# Altium PCB NB2DSK01.PcbDoc (part 2 of 17)
Units mil, origin at the board's own origin, x right, y up, seen from the top; angles counter-clockwise.
Board outline 11815 x 6500.03 mil, 8 copper layers (Top Layer, MidLayer1, MidLayer2, GND, PWR, MidLayer3, MidLayer4, Bottom Layer), stack 74.62 mil thick; 798 components, 1002 nets, 3927 pads, 3182 vias.
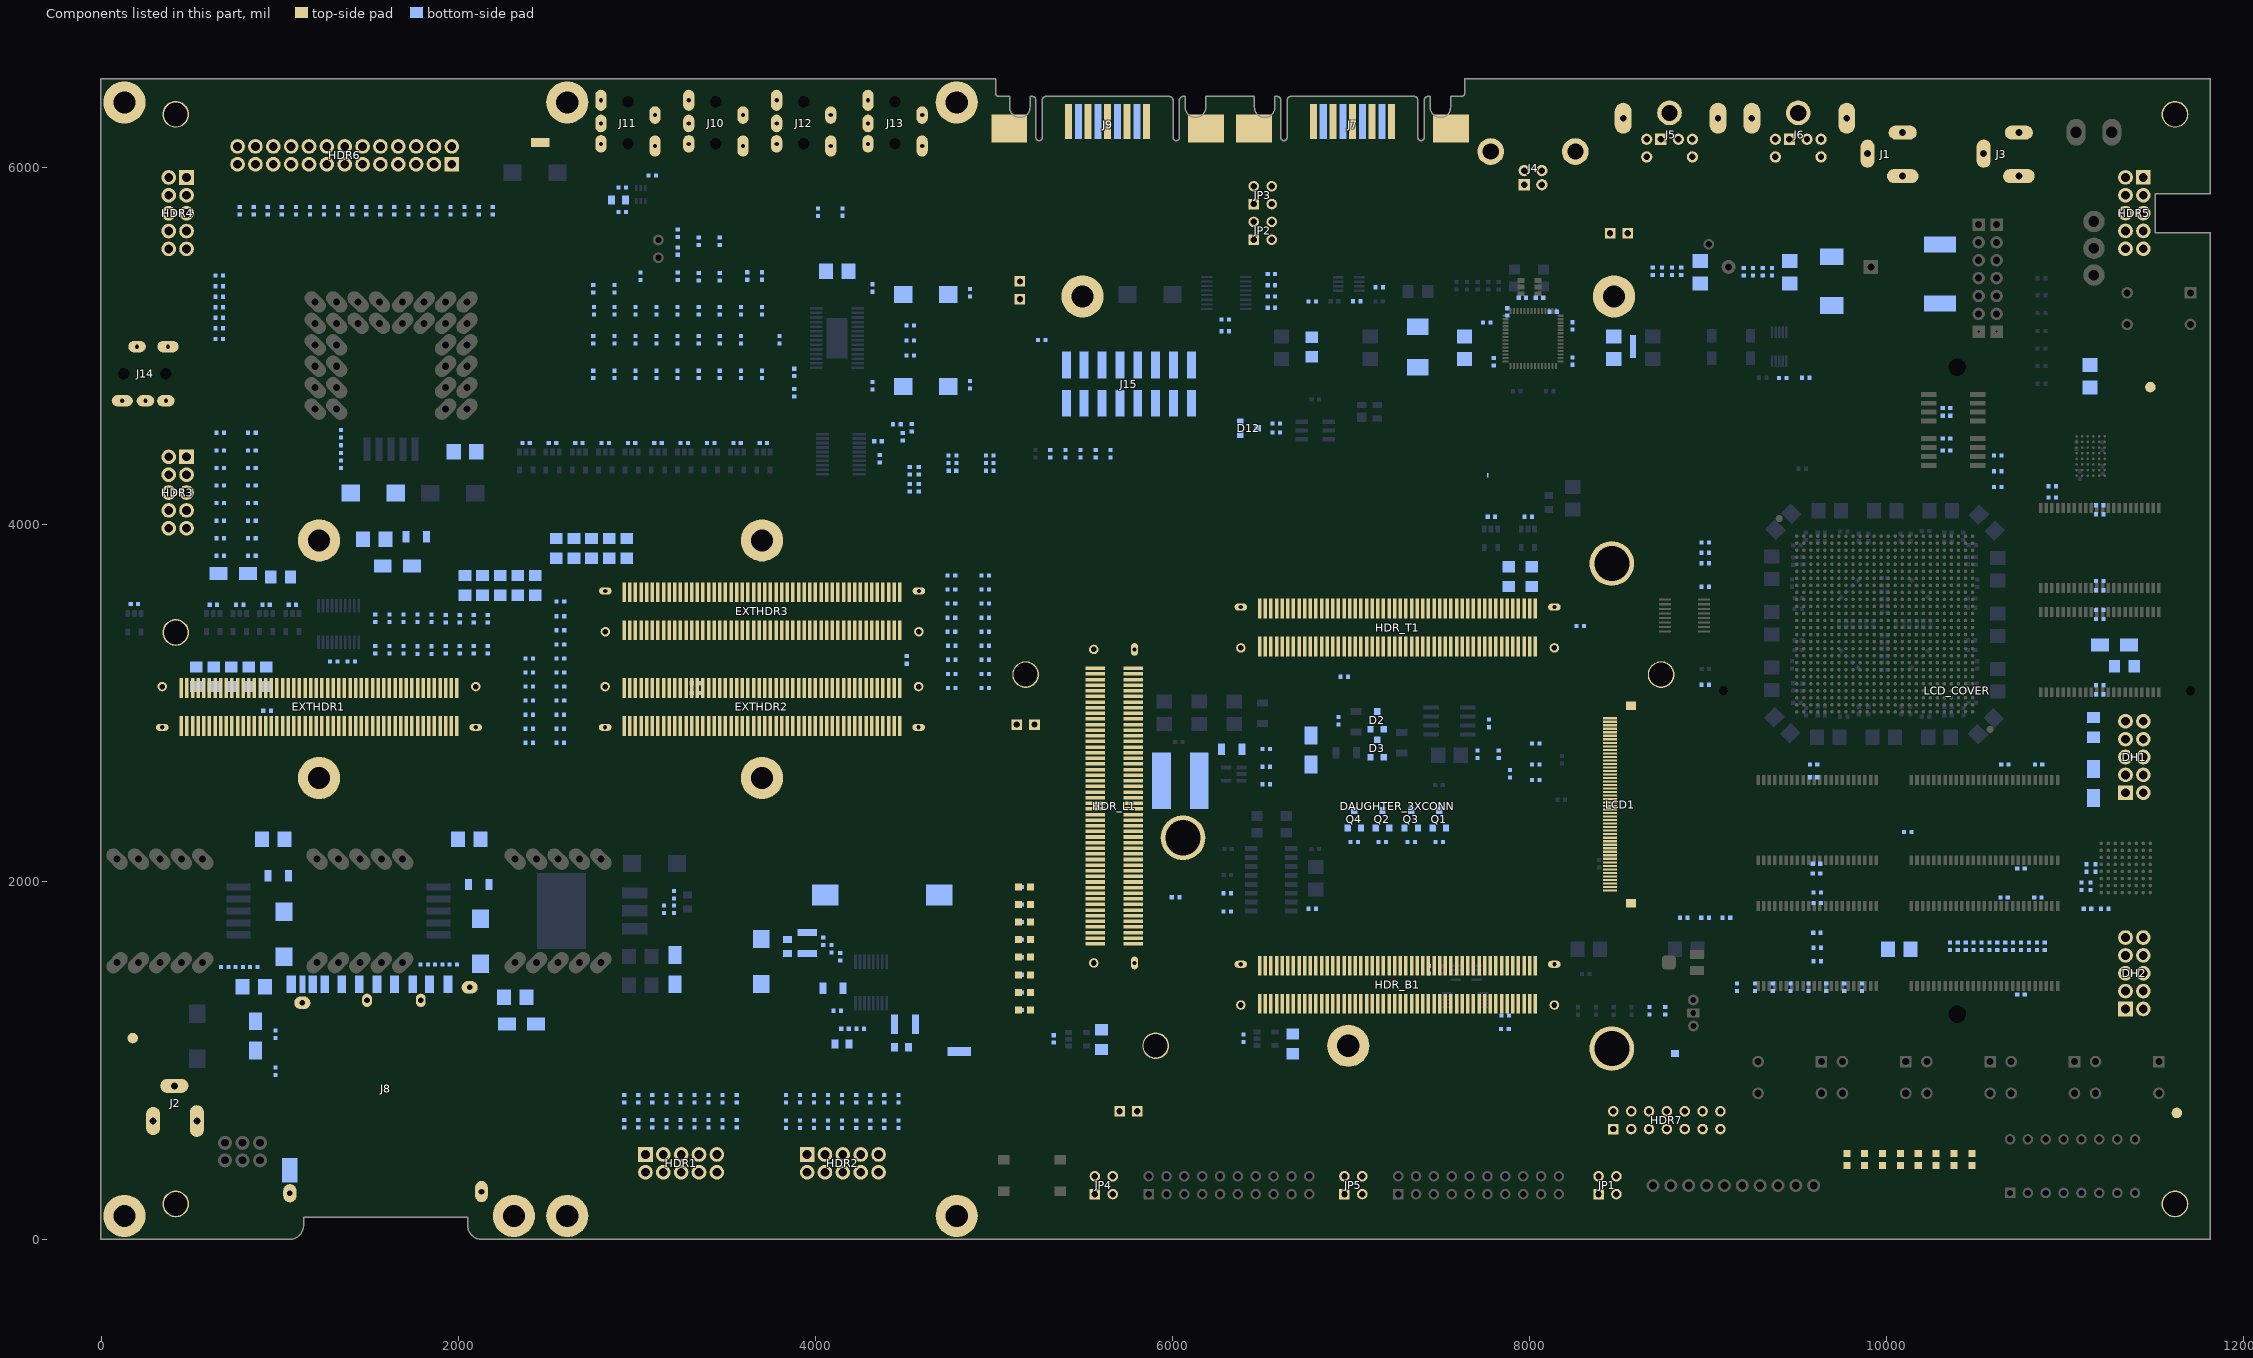
[diagram p8: the components of this part, seen from the top]

## Components (designator, comment, footprint, x,y, rotation, side; value= is the part's Value field where it differs from the comment) (continued)
C144 "1uF 25V" CAPC3216-STAR 6330.71,2744.1 r0 bottom locked (schematic designator C6)
C145 "470pF 50V" CAPC1005-STAR 4165.68,1178.45 r180 bottom (schematic designator C1)
C146 "10uF 10V" CAPC2012-STAR 4482.68,1074.45 r180 bottom (schematic designator C2)
C147 "22uF 10V" CAPC3225-STAR 4500.68,1203.45 r180 bottom (schematic designator C3)
C148 "10uF 10V" CAPC2012-STAR 3843.68,1638.45 r90 bottom (schematic designator C4)
C149 "22uF 10V" CAPC3225-STAR 3953.68,1658.45 r90 bottom (schematic designator C5)
C150 "220uF 10V" CAPC7343-STAR 3696.85,1555.12 r270 bottom (schematic designator C6)
C151 "1uF 25V" CAPC3216-STAR 4098.68,1405.45 r180 bottom (schematic designator C7)
C152 "10uF 10V" CAPC2012-STAR 4149.68,1093.45 r0 bottom (schematic designator C8)
C153 "0.1uF 16V" CAPC1005-STAR 6553.81,5405.51 r0 bottom (schematic designator C1)
C154 "0.1uF 16V" CAPC1005-STAR 6553.81,5342.52 r180 bottom (schematic designator C3)
C155 "0.1uF 16V" CAPC1005-STAR 6553.81,5279.53 r0 bottom (schematic designator C2)
C156 "0.1uF 16V" CAPC1005-STAR 6553.81,5216.54 r0 bottom (schematic designator C4)
C157 "1uF 25V" CAPC3216-STAR 2114.17,1986.59 r0 bottom (schematic designator C2)
C158 "10uF 20V" CAPC3528-STAR 2061.02,2238.45 r180 bottom (schematic designator C1)
C159 "10uF 20V" CAPC3528-STAR 2318.68,1353.45 r0 bottom (schematic designator C3)
C160 "220uF 10V" CAPC7343-STAR 2123.68,1668.45 r90 bottom (schematic designator C4)
C161 "1uF 25V" CAPC3216-STAR 992.13,2034.68 r0 bottom (schematic designator C2)
C162 "10uF 20V" CAPC3528-STAR 963.68,2238.45 r180 bottom (schematic designator C1)
C163 "10uF 20V" CAPC3528-STAR 853.68,1413.45 r180 bottom (schematic designator C3)
C164 "220uF 10V" CAPC7343-STAR 1023.68,1707.45 r90 bottom (schematic designator C4)
C165 "1uF 25V" CAPC3216-STAR 1763.68,3933.45 r180 bottom (schematic designator C2)
C166 "10uF 20V" CAPC3528-STAR 2037.4,4409.45 r0 bottom (schematic designator C1)
C167 "10uF 20V" CAPC3528-STAR 1528.68,3918.45 r0 bottom (schematic designator C3)
C168 "220uF 10V" CAPC7343-STAR 1523.68,4178.45 r0 bottom (schematic designator C4)
C169 "10uF 20V" CAPC3528-STAR 8955.24,5414.21 r270 bottom (schematic designator C1)
C170 "10uF 20V" CAPC3528-STAR 9456.18,5414.21 r270 bottom (schematic designator C1)
C171 "1uF 6.3v" CAPC1005-STAR 2874.02,4842.52 r270 bottom locked (schematic designator C6)
C172 "4.7nF 25V" CAPC1005-STAR 2755.91,4842.52 r270 bottom locked (schematic designator C7)
C173 "1uF 6.3v" CAPC1005-STAR 2992.13,4842.52 r270 bottom locked (schematic designator C8)
C174 "0.1uF 16V" CAPC1005-STAR 3881.89,4740.16 r270 bottom locked (schematic designator C15)
C175 "1uF 6.3v" CAPC1005-STAR 3346.46,4842.52 r270 bottom locked (schematic designator C9)
C176 "1uF 6.3v" CAPC1005-STAR 3582.68,4842.52 r270 bottom locked (schematic designator C11)
C177 "220uF 10V" CAPC7343-STAR 4618.11,5290.66 r0 bottom locked (schematic designator C12)
C178 "1uF 6.3v" CAPC1005-STAR 2755.91,5322.84 r90 bottom locked (schematic designator C26)
C179 "1uF 6.3v" CAPC1005-STAR 3228.68,5533.45 r270 bottom (schematic designator C13)
C180 "220uF 10V" CAPC7343-STAR 4618.11,4775.59 r0 bottom locked (schematic designator C16)
C181 "4.7nF 25V" CAPC1005-STAR 3228.68,5633.45 r90 bottom (schematic designator C50)
C182 "1uF 6.3v" CAPC1005-STAR 2874.02,5322.84 r90 bottom locked (schematic designator C27)
C183 "1uF 6.3v" CAPC1005-STAR 4531.49,4948.08 r0 bottom (schematic designator C10)
C184 "1uF 6.3v" CAPC1005-STAR 3110.24,4842.52 r270 bottom locked (schematic designator C17)
C185 "1uF 6.3v" CAPC1005-STAR 3228.35,4842.52 r270 bottom locked (schematic designator C19)
C186 "1uF 6.3v" CAPC1005-STAR 3700.79,4842.52 r270 bottom locked (schematic designator C20)
C187 "1uF 6.3v" CAPC1005-STAR 3346.46,5389.76 r270 bottom locked (schematic designator C18)
C188 "1uF 6.3v" CAPC1005-STAR 3618.11,5393.7 r90 bottom locked (schematic designator C21)
C189 "4.7nF 25V" CAPC1005-STAR 3700.79,5393.7 r270 bottom locked (schematic designator C22)
C190 "1uF 6.3v" CAPC1005-STAR 3464.57,5389.76 r270 bottom locked (schematic designator C14)
C191 "1uF 6.3v" CAPC1005-STAR 4151.97,5751.58 r270 bottom locked (schematic designator C4)
C192 "1uF 6.3v" CAPC1005-STAR 3464.57,4842.52 r270 bottom locked (schematic designator C5)
C193 "10uF 20V" CAPC3528-STAR 4122.05,5421.26 r180 bottom locked (schematic designator C23)
C194 "0.1uF 16V" CAPC1005-STAR 3881.89,4854.33 r90 bottom locked (schematic designator C24)
C195 "0.1uF 16V" CAPC1005-STAR 4318.9,4779.53 r270 bottom locked (schematic designator C25)
C196 "0.1uF 16V" CAPC1005-STAR 4318.9,5326.77 r270 bottom locked (schematic designator C28)
C197 "10uF 10V" CAPC2012-STAR 2897.64,5818.9 r0 bottom (schematic designator C1MIC)
C198 "0.1uF 16V" CAPC1005-STAR 3086.61,5956.68 r180 bottom (schematic designator C2MIC)
C199 "10nF 16V" CAPC1005-STAR 10334.65,4417.32 r180 bottom locked (schematic designator C1)
C200 "0.1uF 16V" CAPC1005-STAR 10334.63,4611.45 r0 bottom locked (schematic designator C2)
C201 "10nF 16V" CAPC1005-STAR 10334.65,4654.74 r180 bottom locked (schematic designator C3)
C202 "0.1uF 16V" CAPC1005-STAR 10334.65,4484.25 r0 bottom locked (schematic designator C4)
C203 "0.1uF 16V" CAPC1005-STAR 11192.91,4059.06 r180 bottom locked (schematic designator C1)
C204 "0.1uF 16V" CAPC1005-STAR 11192.91,3633.86 r0 bottom locked (schematic designator C2)
C205 "0.1uF 16V" CAPC1005-STAR 11192.91,3472.44 r180 bottom locked (schematic designator C3)
C206 "0.1uF 16V" CAPC1005-STAR 11192.91,3051.18 r0 bottom locked (schematic designator C4)
C207 "10nF 16V" CAPC1005-STAR 11192.91,4110.24 r180 bottom locked (schematic designator C5)
C208 "10nF 16V" CAPC1005-STAR 11192.91,3523.62 r180 bottom locked (schematic designator C6)
C209 "10nF 16V" CAPC1005-STAR 11192.91,3685.04 r0 bottom locked (schematic designator C7)
C210 "10nF 16V" CAPC1005-STAR 11192.91,3102.36 r0 bottom locked (schematic designator C8)
C211 "0.1uF 16V" CAPC1005-STAR 11118.11,2078.56 r270 bottom (schematic designator C1)
C212 "0.1uF 16V" CAPC1005-STAR 11090.55,1976.2 r270 bottom locked (schematic designator C2)
C213 "10nF 16V" CAPC1005-STAR 11220.51,1850.28 r0 bottom (schematic designator C3)
C214 "10nF 16V" CAPC1005-STAR 11169.29,2078.56 r270 bottom (schematic designator C4)
C215 "10nF 16V" CAPC1005-STAR 11141.73,1976.2 r270 bottom locked (schematic designator C5)
C216 "0.1uF 16V" CAPC1005-STAR 11124.11,1850.28 r180 bottom (schematic designator C6)
C217 "10uF 20V" CAPC3528-STAR 11138.28,4831.32 r270 bottom (schematic designator C23_CM)
C218 "10uF 20V" CAPC3528-STAR 10068.88,1623 r180 bottom (schematic designator C24_CM)
C219 "0.1uF 16V" CAPC1005-STAR 10661.42,2657.48 r180 bottom locked (schematic designator C1)
C220 "0.1uF 16V" CAPC1005-STAR 10751.97,2074.8 r180 bottom (schematic designator C2)
C221 "0.1uF 16V" CAPC1005-STAR 10657.48,1913.39 r180 bottom (schematic designator C3)
C222 "0.1uF 16V" CAPC1005-STAR 10751.97,1370.08 r180 bottom (schematic designator C4)
C223 "10nF 16V" CAPC1005-STAR 10850.39,2657.48 r180 bottom (schematic designator C5)
C224 "10nF 16V" CAPC1005-STAR 10117.22,2280.5 r180 bottom locked (schematic designator C6)
C225 "10nF 16V" CAPC1005-STAR 10846.46,1913.39 r180 bottom (schematic designator C7)
C226 "10nF 16V" CAPC1005-STAR 9608.95,1715.33 r0 bottom locked (schematic designator C8)
C227 "0.1uF 16V" CAPC1005-STAR 9606.3,2102.36 r0 bottom locked (schematic designator C1)
C228 "0.1uF 16V" CAPC1005-STAR 9590.55,2657.48 r180 bottom locked (schematic designator C2)
C229 "0.1uF 16V" CAPC1005-STAR 9610.24,1556.18 r0 bottom locked (schematic designator C3)
C230 "0.1uF 16V" CAPC1005-STAR 9610.24,1940.95 r180 bottom locked (schematic designator C4)
C231 "10nF 16V" CAPC1005-STAR 9606.3,2047.24 r0 bottom locked (schematic designator C5)
C232 "10nF 16V" CAPC1005-STAR 9590.55,2586.61 r180 bottom locked (schematic designator C6)
C233 "10nF 16V" CAPC1005-STAR 9610.24,1631.93 r0 bottom (schematic designator C7)
C234 "10nF 16V" CAPC1005-STAR 9610.24,1881.89 r180 bottom locked (schematic designator C8)
C235 "0.1uF 16V" CAPC1005-STAR 7785.43,4045.28 r180 bottom (schematic designator C6CS)
C236 "0.1uF 16V" CAPC1005-STAR 1070.96,3553.15 r180 bottom (schematic designator C11CS)
C237 "0.1uF 16V" CAPC1005-STAR 3708.76,4458.66 r180 bottom (schematic designator C1CS)
C238 "0.1uF 16V" CAPC1005-STAR 3265.85,4458.66 r180 bottom (schematic designator C7CS)
C239 "0.1uF 16V" CAPC1005-STAR 3561.12,4458.66 r180 bottom (schematic designator C12CS)
C240 "0.1uF 16V" CAPC1005-STAR 7992.13,4045.28 r180 bottom (schematic designator C2CS)
C241 "0.1uF 16V" CAPC1005-STAR 2970.57,4458.66 r180 bottom (schematic designator C13CS)
C242 "0.1uF 16V" CAPC1005-STAR 775.69,3553.15 r180 bottom (schematic designator C3CS)
C243 "0.1uF 16V" CAPC1005-STAR 2822.93,4458.66 r180 bottom (schematic designator C8CS)
C244 "0.1uF 16V" CAPC1005-STAR 923.33,3553.15 r180 bottom (schematic designator C9CS)
C245 "0.1uF 16V" CAPC1005-STAR 628.05,3553.15 r180 bottom (schematic designator C14CS)
C246 "0.1uF 16V" CAPC1005-STAR 186.22,3556.84 r180 bottom (schematic designator C4CS)
C247 "0.1uF 16V" CAPC1005-STAR 3413.48,4458.66 r180 bottom (schematic designator C10CS)
C248 "0.1uF 16V" CAPC1005-STAR 2675.3,4458.66 r180 bottom (schematic designator C5CS)
C249 "0.1uF 16V" CAPC1005-STAR 3118.21,4458.66 r180 bottom (schematic designator C15CS)
C250 "0.1uF 16V" CAPC1005-STAR 2527.66,4458.66 r180 bottom (schematic designator C16CS)
C251 "0.1uF 16V" CAPC1005-STAR 5334.73,1121.45 r270 bottom (schematic designator C18CS)
C252 "0.1uF 16V" CAPC1005-STAR 2380.02,4458.66 r180 bottom (schematic designator C17CS)
C253 "0.1uF 16V" CAPC1005-STAR 6398.2,1124.47 r270 bottom (schematic designator C19CS)
C254 "0.1uF 16V" CAPC1005-STAR 4360.24,4370.08 r270 bottom (schematic designator C1_CS)
C255 "0.1uF 16V" CAPC1005-STAR 1302.09,3234.1 r180 bottom (schematic designator C2_CS)
C256 "0.1uF 16V" CAPC1005-STAR 1400.51,3234.09 r180 bottom (schematic designator C26_CS)
C257 "0.1uF 16V" CAPC1005-STAR 4350.39,4468.5 r0 bottom (schematic designator C25_CS)
C258 "0.1uF 16V" CAPC1005-STAR 4976.38,4303.15 r0 bottom (schematic designator C20CS)
C259 "0.1uF 16V" CAPC1005-STAR 4767.72,4303.15 r180 bottom (schematic designator C21CS)
C260 "0.1uF 16V" CAPC1005-STAR 4538.92,4543.61 r270 bottom (schematic designator C22CS)
C261 "0.1uF 16V" CAPC1005-STAR 4528.77,4303.15 r270 bottom (schematic designator C23CS)
C262 "0.1uF 16V" CAPC1005-STAR 4578.74,4303.15 r270 bottom (schematic designator C24CS)
C263 "0.1uF 16V" CAPC1005-STAR 7874,5192.9 r270 bottom (schematic designator C4_US)
C264 "0.1uF 16V" CAPC1005-STAR 8240.16,4917.32 r270 bottom locked (schematic designator C6_US)
C265 "0.1uF 16V" CAPC1005-STAR 8240.16,5114.17 r90 bottom (schematic designator C7_US)
C266 "10uF 20V" CAPC3528-STAR 7635.07,4992.74 r270 bottom locked (schematic designator C3_US)
C267 "0.1uF 16V" CAPC1005-STAR 7759.84,5133.86 r180 bottom locked (schematic designator C5_US)
C268 "0.1uF 16V" CAPC1005-STAR 7799.21,4913.39 r270 bottom locked (schematic designator C8_US)
C269 "22pF 50V" CAPC1005-STAR 8055.12,5272.46 r180 bottom (schematic designator C1_US)
C270 "22pF 50V" CAPC1005-STAR 7959.61,5272.46 r0 bottom (schematic designator C2_US)
C271 "4.7nF 250V" CAPM7163 7373.44,4996.05 r270 bottom locked (schematic designator C11_US)
C272 "0.1uF 16V" CAPC1005-STAR 8131.35,5193.1 r180 bottom (schematic designator C10_US)
C273 "10uF 20V" CAPC3528-STAR 8470.68,4991.08 r270 bottom (schematic designator C9_US)
D1 "5V 5W" DIOM8059 9691.93,5364.54 r90 bottom locked
D2 "35mA 7.5V" SOT95P230-3D 7145.67,2905.51 r180 bottom locked (schematic designator D1)
D3 "200mA 30V" SOT95P230-3C 7145.67,2748.03 r180 bottom locked (schematic designator D2)
D4 "3A 40V" DIOM5027 3213.72,1508.86 r90 bottom locked (schematic designator D1)
D5 "3A 40V" DIOM5027 6775.59,2739.17 r90 bottom (schematic designator D1)
D6 "3A 40V" DIOM5027 2353.68,1203.45 r0 bottom (schematic designator D1)
D7 "3A 40V" DIOM5027 863.68,1138.45 r270 bottom (schematic designator D1)
D8 "3A 40V" DIOM5027 1658.68,3768.45 r0 bottom (schematic designator D1)
D9 "3A 40V" DIOM5027 11275.57,3326.76 r180 bottom (schematic designator D10)
D10 "3A 40V" DIOM5027 11157.46,2551.18 r270 bottom
D11 "3A 40V" DIOM5027 739.47,3727.35 r180 bottom (schematic designator D12)
D12 "3.3V" SOT95P230-3D 6427.82,4542 r90 bottom (schematic designator D1)
DAUGHTER_3XCONN "Comment" DAUGHTER_BOARD_3XCONN 6984.25,1082.68 r0 top locked
DH1 "2x5 R/A HEADER BOXED MALE" 918510X323#1 11437.01,2700 r90 bottom locked
DH2 "2x5 R/A HEADER BOXED MALE" 918510X323#1 11437.01,1488.98 r90 bottom locked (schematic designator DH1)
EXTHDR1 "NANOCONNECT" 53751 1220.47,2980.32 r180 top locked (schematic designator EXTHDR)
EXTHDR2 "NANOCONNECT" 53751 3700.79,2980.32 r180 top locked (schematic designator EXTHDR)
EXTHDR3 "NANOCONNECT" 53751 3700.79,3515.75 r0 top locked (schematic designator EXTHDR)
F1 "MF-SM300-2" MF_SM250 10303.13,5478.17 r270 bottom
F2 "MF-NSMF035 350mA" RESC3216 6779.51,4996.05 r90 bottom (schematic designator F6)
F3 "MF-NSMF035 350mA" RESC3216 11330.71,3208.66 r180 bottom (schematic designator F4)
F4 "MF-NSMF035 350mA" RESC3216 11157.46,2866.14 r90 bottom
F5 "MF-NSMF035 350mA" RESC3216 1005.16,3708.28 r0 bottom (schematic designator F1)
FD1 "Fiducial - Round" "FIDUCIAL ROUND" 11476.36,4771.64 r90 top (schematic designator FD3)
FD2 "Fiducial - Round" "FIDUCIAL ROUND" 11624.68,706.45 r90 top (schematic designator FD1)
FD3 "Fiducial - Round" "FIDUCIAL ROUND" 177.17,1125.98 r90 top (schematic designator FD2)
FP1 "Daughterboard Mounting Holes" DAUGHTER_BOARD_2XCONN 7259.84,2425.2 r0 top locked
GP1 "1x2 HEADER Male" HDR1X2 5226.46,2881.88 r180 top locked
GP2 "1x2 HEADER Male" HDR1X2 8450.68,5632.45 r0 top
GP3 "1x2 HEADER Male" HDR1X2 5145.66,5263.77 r90 top locked
GP4 "1x2 HEADER Male" HDR1X2 5703.53,716.24 r0 top locked
HDR1 "2x5 R/A HEADER BOXED MALE" 918510X323#1 3248.03,374.02 r0 bottom locked
HDR2 "2x5 R/A HEADER BOXED MALE" 918510X323#1 4153.54,374.02 r0 bottom locked (schematic designator HDR1)
HDR3 "2x5 R/A HEADER BOXED MALE" 918510X323#1 377.95,4181.1 r270 bottom locked (schematic designator HDR1)
HDR4 "2x5 RA HEADER MALE" 918510X323#2 377.95,5745.67 r90 bottom (schematic designator HDR1)
HDR5 "2x5 RA HEADER" 918510X323#3 11437.01,5746.06 r90 bottom locked (schematic designator HDR2)
HDR6 "2x13 R/A HEADER BOXED MALE" HDR2X13_RA_CENTRONICS 1363.78,6119.69 r180 bottom locked (schematic designator HDR1)
HDR7 "2x7 HEADER MALE" HDR2X7 8468.5,616.54 r0 top locked (schematic designator HDR1)
HDR_B1 "NANOCONNECT" 53751 7259.84,1425.2 r0 top locked (schematic designator HDR_B)
HDR_L1 "NANOCONNECT" 53751 5673.23,2425.2 r270 top locked (schematic designator HDR_L)
HDR_T1 "NANOCONNECT" 53751 7259.84,3425.2 r0 top locked (schematic designator HDR_T)
J1 "POWERJACK 3 HEADER" KLD-0202 10089.37,6492.13 r270 top locked (schematic designator J11)
J2 "POWERJACK 3 HEADER" KLD-0202 -3.94,661.42 r0 bottom (schematic designator J1OUT)
J3 "POWERJACK 3 HEADER" KLD-0202 10739.76,6492.13 r270 top locked (schematic designator J12)
J4 "USB B HEADER" 440119 8018.9,5944.49 r90 top locked (schematic designator J1)
J5 "MINIDIN 6P PURPLE" MINIDIN6PURPLE 8783.46,6492.13 r270 top locked (schematic designator J1)
J6 "MINIDIN 6P GREEN" MINIDIN6GREEN 9503.94,6492.13 r270 top locked (schematic designator J1)
J7 "070221XE009GX14BU" 070221XE009GX14BU#1 7008,6259.84 r0 top locked (schematic designator J1)
J8 "SD CARD HEADER" SD_CARD_HRS_609_0003_5 1568.68,1378.45 r180 bottom locked (schematic designator J1)
J9 "070221XE009GX14BU" 070221XE009GX14BU#2 5636.78,6259.84 r0 top locked (schematic designator J1)
J10 "AUDIO BLACK HEADER" TSH-3675 3442.28,6370.08 r270 bottom locked (schematic designator J1)
J11 "AUDIO PINK HEADER" TSH-3675 2950.16,6370.08 r270 bottom locked (schematic designator J2)
J12 "AUDIO GREEN HEADER" TSH-3675 3934.41,6370.08 r270 bottom locked (schematic designator J3)
J13 "AUDIO BLUE HEADER" TSH-3675 4446.22,6370.08 r270 bottom locked (schematic designator J4)
J14 "AUDIO BLACK HEADER" TSH-3675 125.98,4846.46 r0 bottom locked (schematic designator J5)
J15 "TYCO 969973-8" HDR2X8_SMT 6105.23,4681.09 r180 bottom locked (schematic designator J1)
JP1 "2x2 HEADER MALE" HDR2X2 8385.83,251.97 r0 top locked
JP2 "2x2 HEADER MALE" HDR2X2 6455.12,5596.85 r0 top locked
JP3 "2x2 HEADER MALE" HDR2X2 6455.12,5796.85 r0 top locked (schematic designator JP1)
JP4 "2x2 HEADER MALE" HDR2X2 5565.12,251.81 r0 top locked (schematic designator JP1)
JP5 "2x2 HEADER MALE" HDR2X2 6962.76,251.81 r0 top locked (schematic designator JP2)
L1 "10uH 2.3A 70mR" INDP7575 6043.31,2566.93 r0 bottom locked
L2 "2.2uH 9A 6.8mR" INDP182140 4374.68,1927.45 r180 bottom locked (schematic designator L1)
LCD1 "LCD HEADER" HITACHI_TX09D50VM1CAA 9086.61,3070.87 r0 top locked
LCD_COVER "Comment" LCD_COVER 10393.7,4881.89 r0 top locked
LED1 "0603 LED" 0603LED 5171.26,1972.44 r180 top locked (schematic designator LED0)
LED2 "0603 LED" 0603LED 5171.26,1874.02 r180 top locked (schematic designator LED1)
LED3 "0603 LED" 0603LED 5171.26,1775.59 r180 top locked (schematic designator LED2)
LED4 "0603 LED" 0603LED 5171.26,1677.17 r180 top locked (schematic designator LED3)
LED5 "0603 LED" 0603LED 5171.26,1578.74 r180 top locked (schematic designator LED4)
LED6 "0603 LED" 0603LED 5171.26,1480.32 r180 top locked (schematic designator LED5)
LED7 "0603 LED" 0603LED 5171.26,1381.89 r180 top locked (schematic designator LED6)
LED8 "0603 LED" 0603LED 5171.26,1283.47 r180 top locked (schematic designator LED7)
LED9 "LED, Green, 0603 (1608)" 0603LED 10476.38,445.94 r270 top locked (schematic designator LED0)
LED10 "LED, Green, 0603 (1608)" 0603LED 10376.38,445.95 r270 top locked (schematic designator LED1)
LED11 "LED, Green, 0603 (1608)" 0603LED 10276.38,445.95 r270 top locked (schematic designator LED2)
LED12 "LED, Green, 0603 (1608)" 0603LED 10176.38,445.95 r270 top locked (schematic designator LED3)
LED13 "LED, Green, 0603 (1608)" 0603LED 10076.38,445.95 r270 top locked (schematic designator LED4)
LED14 "LED, Green, 0603 (1608)" 0603LED 9976.38,445.95 r270 top locked (schematic designator LED5)
LED15 "LED, Green, 0603 (1608)" 0603LED 9876.38,445.95 r270 top locked (schematic designator LED6)
LED16 "LED, Green, 0603 (1608)" 0603LED 9776.38,445.95 r270 top locked (schematic designator LED7)
LOGO1 "Nanoboard Logo" "NANOBOARD LOGO" 6753.7,650.76 r180 bottom
LOGO2 "Nanoboard Logo" "NANOBOARD LOGO" 6960.63,744.09 r0 top
MH1 "MOUNTING HOLE 3MM" MOUNTING_HOLE_3MM 11614.17,196.85 r180 top locked
MH2 "MOUNTING HOLE 3MM" MOUNTING_HOLE_3MM 417.32,3397.64 r180 top locked (schematic designator MH6)
MH3 "MOUNTING HOLE 3MM" MOUNTING_HOLE_3MM 417.32,196.85 r0 top locked (schematic designator MH2)
MH4 "MOUNTING HOLE 3MM" MOUNTING_HOLE_3MM 5177.17,3161.42 r0 top locked (schematic designator MH7)
MH5 "MOUNTING HOLE 3MM" MOUNTING_HOLE_3MM 417.32,6299.21 r90 top locked (schematic designator MH3)
MH6 "MOUNTING HOLE 3MM" MOUNTING_HOLE_3MM 5905.51,1082.68 r180 top locked (schematic designator MH8)
MH7 "MOUNTING HOLE 3MM" MOUNTING_HOLE_3MM 11614.17,6299.21 r0 top locked (schematic designator MH4)
MH8 "MOUNTING HOLE 3MM" MOUNTING_HOLE_3MM 8736.22,3161.42 r180 top locked (schematic designator MH5)
NT1 "Net Tie SMT2" NETTIE-SMT2-31X51#1 4814.68,1051.45 r0 bottom net-tie (schematic designator NT2)
NT2 "Net Tie SMT2" NETTIE-SMT2-16X11 8784.2,1066.5 r180 bottom net-tie (schematic designator NT1)
NT3 "Net Tie SMT2" NETTIE-SMT2-8X8#1 10452.68,1525.45 r270 top net-tie (schematic designator NT8)
NT4 "Net Tie SMT2" NETTIE-SMT2-31X39 2411.9,6142.8 r180 top net-tie (schematic designator NT1)
NT5 "Net Tie SMT2" NETTIE-SMT2-31X51#2 8578.72,5007.86 r90 bottom net-tie (schematic designator NT3)
NT6 "Net Tie SMT2" NETTIE-SMT2-8X8#2 7764.76,4247.05 r270 bottom net-tie (schematic designator NT1_CS)
PB_MH1 "MOUNTING HOLE 3MM SOLDER STANDOFF" STANDOFF_SOLDER_3MM 129.92,6366.14 r90 top locked (schematic designator PB_MH7)
PB_MH2 "MOUNTING HOLE 3MM SOLDER STANDOFF" STANDOFF_SOLDER_3MM 1220.47,2582.68 r180 top locked (schematic designator PB_MH1)
PB_MH3 "MOUNTING HOLE 3MM SOLDER STANDOFF" STANDOFF_SOLDER_3MM 2610.24,6366.14 r180 top locked (schematic designator PB_MH8)
PB_MH4 "MOUNTING HOLE 3MM SOLDER STANDOFF" STANDOFF_SOLDER_3MM 129.92,129.92 r180 top locked (schematic designator PB_MH2)
PB_MH5 "MOUNTING HOLE 3MM SOLDER STANDOFF" STANDOFF_SOLDER_3MM 4791.34,6366.14 r270 top locked (schematic designator PB_MH9)
PB_MH6 "MOUNTING HOLE 3MM SOLDER STANDOFF" STANDOFF_SOLDER_3MM 2311.02,129.92 r270 top locked (schematic designator PB_MH3)
PB_MH7 "MOUNTING HOLE 3MM SOLDER STANDOFF" STANDOFF_SOLDER_3MM 3700.79,3913.39 r180 top locked (schematic designator PB_MH10)
PB_MH8 "MOUNTING HOLE 3MM SOLDER STANDOFF" STANDOFF_SOLDER_3MM 1220.47,3913.39 r180 top locked (schematic designator PB_MH11)
PB_MH9 "MOUNTING HOLE 3MM SOLDER STANDOFF" STANDOFF_SOLDER_3MM 3700.79,2582.68 r180 top locked (schematic designator PB_MH4)
PB_MH10 "MOUNTING HOLE 3MM SOLDER STANDOFF" STANDOFF_SOLDER_3MM 5496.06,5279.53 r90 top locked (schematic designator PB_MH12)
PB_MH11 "MOUNTING HOLE 3MM SOLDER STANDOFF" STANDOFF_SOLDER_3MM 2610.24,129.92 r180 top locked (schematic designator PB_MH5)
PB_MH12 "MOUNTING HOLE 3MM SOLDER STANDOFF" STANDOFF_SOLDER_3MM 8472.44,5279.53 r90 top locked (schematic designator PB_MH13)
PB_MH13 "MOUNTING HOLE 3MM SOLDER STANDOFF" STANDOFF_SOLDER_3MM 4791.34,129.92 r270 top locked (schematic designator PB_MH6)
PB_MH14 "MOUNTING HOLE 3MM SOLDER STANDOFF" STANDOFF_SOLDER_3MM 6984.25,1082.68 r90 top locked
PBFREE "" LEAD_FREE_S 4614.17,4990 r0 top
PBOARD_A "Comment" PERIPHERAL_BOARD_1SLOT#1 2440.96,3228.34 r180 top locked
PBOARD_B "Comment" PERIPHERAL_BOARD_1SLOT#2 4921.26,3228.35 r180 top locked
PBOARD_C "Comment" PERIPHERAL_BOARD_2SLOT 0,3267.72 r0 top locked
Q1 "TRA-NPN-40V-40V-5V-SOT23" SOT95P230-3C 7494.42,2351.65 r180 bottom locked
Q2 "TRA-NPN-40V-40V-5V-SOT23" SOT95P230-3C 7175.52,2351.65 r180 bottom locked
Q3 "TRA-NPN-40V-40V-5V-SOT23" SOT95P230-3C 7336.93,2351.65 r180 bottom locked
Q4 "TRA-NPN-40V-40V-5V-SOT23" SOT95P230-3C 7018.04,2351.65 r180 bottom locked
R1 "4k7 1%" RESC1005-STAR 9417.94,4823 r0 bottom locked
R2 "27R 1%" RESC1005-STAR 9546.82,4823.89 r180 bottom locked
R3 "5R6 1%" RESC1005-STAR 6307.09,1937.01 r0 bottom locked (schematic designator R1)
R4 "5R6 1%" RESC1005-STAR 6783.47,1850.39 r180 bottom locked (schematic designator R2)
R5 "1K 1%" RESC1005-STAR 6307.09,1834.65 r180 bottom locked (schematic designator R3)
R6 "4K7 1%" RESC1005-STAR 8670.97,1278.04 r90 bottom (schematic designator R1)
R7 "4K7 1%" RESC1005-STAR 8759.97,1278.04 r90 bottom (schematic designator R2)
R8 "100R 1%" RESC1005-STAR 7863.79,1251.8 r0 bottom (schematic designator R3)
R9 "100R 1%" RESC1005-STAR 7861.82,1177 r0 bottom (schematic designator R4)
R10 "5R6 1%" RESC1005-STAR 7436.99,1507.87 r270 bottom (schematic designator R5)
R11 "4K7 1%" RESC1005-STAR 8983.28,3784.68 r180 bottom (schematic designator R1)
R12 "4K7 1%" RESC1005-STAR 10927.17,4216.54 r180 bottom locked (schematic designator R7_S3)
R13 "4K7 1%" RESC1005-STAR 10620.46,4300.43 r0 bottom (schematic designator R4)
R14 "4K7 1%" RESC1005-STAR 10620.46,4212.6 r0 bottom (schematic designator R5_S3)
R15 "100R 1%" RESC1005-STAR 8983.28,3902.07 r0 bottom (schematic designator R24)
R16 "100R 1%" RESC1005-STAR 10927.17,4153.35 r180 bottom (schematic designator R15)
R17 "5R6 1%" RESC1005-STAR 8983.28,3653.54 r0 bottom (schematic designator R1_HOST)
R18 "2K2 1%" RESC1005-STAR 8283.68,3433.45 r180 bottom (schematic designator R2)
R19 "4K7 1%" RESC1005-STAR 6960.62,3149.6 r180 bottom (schematic designator R1)
R20 "2K2 1%" RESC1005-STAR 3328.68,3058.45 r0 bottom (schematic designator R3)
R21 "47R 1%" RESC1005-STAR 775.59,5759.84 r270 bottom locked (schematic designator R8_PP)
R22 "47R 1%" RESC1005-STAR 854.33,5759.84 r270 bottom locked (schematic designator R10_PP)
R23 "47R 1%" RESC1005-STAR 933.07,5759.84 r270 bottom locked (schematic designator R11_PP)
R24 "47R 1%" RESC1005-STAR 1011.81,5759.84 r270 bottom locked (schematic designator R12_PP)
R25 "100R 1%" RESC1005-STAR 1090.55,5759.84 r90 bottom locked (schematic designator R13_PP)
R26 "100R 1%" RESC1005-STAR 1169.29,5759.84 r90 bottom locked (schematic designator R14_PP)
R27 "100R 1%" RESC1005-STAR 1248.03,5759.84 r90 bottom locked (schematic designator R16_PP)
R28 "100R 1%" RESC1005-STAR 1326.77,5759.84 r90 bottom locked (schematic designator R17_PP)
R29 "100R 1%" RESC1005-STAR 1405.51,5759.84 r90 bottom locked (schematic designator R18_PP)
R30 "100R 1%" RESC1005-STAR 1641.73,5759.84 r90 bottom locked (schematic designator R19_PP)
R31 "100R 1%" RESC1005-STAR 1799.21,5759.84 r90 bottom locked (schematic designator R20_PP)
R32 "100R 1%" RESC1005-STAR 2035.43,5759.84 r90 bottom locked (schematic designator R21_PP)
R33 "100R 1%" RESC1005-STAR 2192.91,5759.84 r90 bottom locked (schematic designator R22_PP)
R34 "1K 1%" RESC1005-STAR 1484.25,5759.84 r270 bottom locked (schematic designator R1)
R35 "100R 1%" RESC1005-STAR 2114.17,5759.84 r90 bottom locked (schematic designator R23_PP)
R36 "47R 1%" RESC1005-STAR 1956.69,5759.84 r270 bottom locked (schematic designator R24_PP)
R37 "100R 1%" RESC1005-STAR 1877.95,5759.84 r90 bottom locked (schematic designator R25_PP)
R38 "100R 1%" RESC1005-STAR 1720.47,5759.84 r90 bottom locked (schematic designator R26_PP)
R39 "1K 1%" RESC1005-STAR 1562.99,5759.84 r90 bottom locked (schematic designator R27_PP)
R40 "47K 1%" RESC1005-STAR 9102.34,1799.21 r180 bottom (schematic designator R2)
R41 "3K9 1%" RESC1005-STAR 8862.19,1799.21 r180 bottom (schematic designator R1)
R42 "47K 1%" RESC1005-STAR 8982.27,1799.21 r180 bottom (schematic designator R3)
R43 "1K 1%" RESC1005-STAR 7889.76,2606.3 r90 bottom locked (schematic designator R9)
R44 "5K6 1%" RESC1005-STAR 8033.46,2775.59 r0 bottom locked (schematic designator R10)
R45 "15K 1%" RESC1005-STAR 8033.46,2657.48 r0 bottom locked (schematic designator R12)
R46 "15K 1%" RESC1005-STAR 8033.46,2570.87 r0 bottom locked (schematic designator R11)
R47 "47K 1%" RESC1005-STAR 8984.22,3104.85 r0 bottom locked (schematic designator R19)
R48 "1K 1%" RESC1005-STAR 7494.41,2223.69 r0 bottom (schematic designator R4)
R49 "1K 1%" RESC1005-STAR 7175.52,2223.69 r0 bottom locked (schematic designator R5)
R50 "27R 1%" RESC1005-STAR 7336.93,2223.69 r0 bottom locked (schematic designator R6)
R51 "27R 1%" RESC1005-STAR 7018.04,2223.69 r0 bottom locked (schematic designator R7)
R52 "4K7 1%" RESC1005-STAR 10620.46,4388.25 r0 bottom (schematic designator R1)
R53 "270R 1%" RESC1005-STAR 7031.97,5251.96 r0 bottom (schematic designator R1)
R54 "120R 1%" RESC1005-STAR 6782.39,5251.05 r0 bottom (schematic designator R2)
R55 "15K 1%" RESC1005-STAR 7157.47,5330.7 r0 bottom (schematic designator R3)
R56 "4K7 1%" RESC1005-STAR 6929.13,2903.54 r90 bottom locked (schematic designator R1)
R57 "220R 1%" RESC1005-STAR 7771.65,2887.8 r90 bottom locked (schematic designator R1)
R58 "2K7 1%" RESC1005-STAR 7708.54,2714.57 r90 bottom (schematic designator R2)
R59 "2K7 1%" RESC1005-STAR 7826.65,2714.57 r90 bottom (schematic designator R3)
R60 "120R 1%" RESC1005-STAR 3151.97,1846.85 r90 bottom locked (schematic designator R1)
R61 "47R 1%" RESC1005-STAR 3208.68,1847.82 r90 bottom (schematic designator R2)
R62 "5R6 1%" RESC1005-STAR 3208.66,1929.63 r90 bottom (schematic designator R3)
R63 "100K 1%" RESC1005-STAR 6525.59,2744.1 r0 bottom locked (schematic designator R1)
R64 "8K2 1%" RESC1005-STAR 6525.59,2547.24 r180 bottom locked (schematic designator R2)
R65 "680K 1%" RESC1005-STAR 6525.59,2645.67 r180 bottom locked (schematic designator R3)
R66 "33R 1%" RESC1005-STAR 4250.68,1178.45 r0 bottom (schematic designator R1)
R67 "2K7 1%" RESC1005-STAR 4043.68,1668.45 r90 bottom (schematic designator R2)
R68 "27K 1%" RESC1005-STAR 4090.68,1626.45 r90 bottom (schematic designator R3)
R69 "100K 1%" RESC1005-STAR 4121.68,1278.45 r0 bottom (schematic designator R4)
R70 "2K7 1%" RESC1005-STAR 4138.68,1581.45 r90 bottom (schematic designator R5)
R71 "100R 1%" RESC1005-STAR 6294.35,5084 r180 bottom locked (schematic designator R1)
R72 "100R 1%" RESC1005-STAR 6294.35,5150.61 r180 bottom locked (schematic designator R2)
R73 "10K 1%" RESC1005-STAR 1972.72,1538.45 r180 bottom (schematic designator R1)
R74 "330R 1%" RESC1005-STAR 1890.83,1538.45 r180 bottom (schematic designator R2)
R75 "22K 1%" RESC1005-STAR 1808.68,1538.45 r0 bottom (schematic designator R3)
R76 "22K 1%" RESC1005-STAR 853.66,1523.45 r0 bottom (schematic designator R1)
R77 "1K 1%" RESC1005-STAR 773.68,1523.45 r180 bottom (schematic designator R2)
R78 "22K 1%" RESC1005-STAR 692.1,1523.45 r180 bottom (schematic designator R3)
R79 "22K 1%" RESC1005-STAR 1343.68,4339.85 r270 bottom (schematic designator R1)
R80 "3K3 1%" RESC1005-STAR 1343.68,4424.85 r270 bottom (schematic designator R2)
R81 "15K 1%" RESC1005-STAR 1343.68,4509.85 r270 bottom (schematic designator R3)
R82 "4K7 1%" RESC1005-STAR 976.38,1147.64 r90 bottom locked (schematic designator R1)
R83 "4K7 1%" RESC1005-STAR 976.38,940.95 r270 bottom locked (schematic designator R2)
R84 "4K7 1%" RESC1005-STAR 8689.73,5420.51 r90 bottom locked (schematic designator R1)
R85 "4K7 1%" RESC1005-STAR 8848.51,5420.51 r90 bottom locked (schematic designator R2)
R86 "100R 1%" RESC1005-STAR 8796.9,5420.51 r90 bottom locked (schematic designator R3)
R87 "100R 1%" RESC1005-STAR 8741.35,5420.51 r90 bottom locked (schematic designator R4)
R88 "4K7 1%" RESC1005-STAR 9198.54,5416.58 r90 bottom (schematic designator R1)
R89 "4K7 1%" RESC1005-STAR 9357.32,5416.58 r90 bottom (schematic designator R2)
R90 "100R 1%" RESC1005-STAR 9305.71,5416.58 r90 bottom (schematic designator R3)
R91 "100R 1%" RESC1005-STAR 9250.16,5416.58 r90 bottom (schematic designator R4)
R92 "270R 1%" RESC1005-STAR 5178.35,1972.44 r0 bottom locked (schematic designator R1)
R93 "270R 1%" RESC1005-STAR 5178.35,1874.02 r0 bottom locked (schematic designator R2)
R94 "270R 1%" RESC1005-STAR 5178.35,1775.59 r0 bottom locked (schematic designator R3)
R95 "270R 1%" RESC1005-STAR 5178.35,1677.17 r0 bottom locked (schematic designator R4)
R96 "270R 1%" RESC1005-STAR 5178.35,1578.74 r0 bottom locked (schematic designator R5)
R97 "270R 1%" RESC1005-STAR 5178.35,1480.32 r0 bottom locked (schematic designator R6)
R98 "270R 1%" RESC1005-STAR 5178.35,1381.89 r0 bottom locked (schematic designator R7)
R99 "270R 1%" RESC1005-STAR 5178.35,1283.47 r0 bottom locked (schematic designator R8)
R100 "270R 1%" RESC1005-STAR 9861.4,1411.28 r270 bottom (schematic designator R1)
R101 "270R 1%" RESC1005-STAR 9761.4,1411.28 r270 bottom (schematic designator R2)
R102 "270R 1%" RESC1005-STAR 9661.4,1411.28 r270 bottom (schematic designator R3)
R103 "270R 1%" RESC1005-STAR 9561.4,1411.28 r270 bottom (schematic designator R4)
R104 "270R 1%" RESC1005-STAR 9461.4,1411.28 r270 bottom (schematic designator R5)
R105 "270R 1%" RESC1005-STAR 9361.4,1411.28 r270 bottom (schematic designator R6)
R106 "270R 1%" RESC1005-STAR 9261.4,1411.28 r270 bottom (schematic designator R7)
R107 "270R 1%" RESC1005-STAR 9161.4,1411.28 r270 bottom (schematic designator R8)
R108 "3K3 1%" RESC1005-STAR 2755.91,5037.4 r270 bottom locked (schematic designator R6)
R109 "47K 1%" RESC1005-STAR 2874.02,5037.4 r90 bottom locked (schematic designator R7)
R110 "100K 1%" RESC1005-STAR 4531.49,5032.72 r180 bottom (schematic designator R19)
R111 "100K 1%" RESC1005-STAR 4531.49,5117.37 r180 bottom (schematic designator R10)
R112 "47K 1%" RESC1005-STAR 2992.13,5037.4 r90 bottom locked (schematic designator R8)
R113 "47K 1%" RESC1005-STAR 3346.46,5037.4 r90 bottom locked (schematic designator R9)
R114 "47K 1%" RESC1005-STAR 3582.68,5037.4 r90 bottom locked (schematic designator R12)
R115 "47K 1%" RESC1005-STAR 2759.84,5198.82 r270 bottom locked (schematic designator R28)
R116 "68K 1%" RESC1005-STAR 3346.46,5198.82 r90 bottom locked (schematic designator R11)
R117 "22K 1%" RESC1005-STAR 3228.68,5393.45 r90 bottom (schematic designator R50)
R118 "100K 1%" RESC1005-STAR 3021.08,5393.45 r270 bottom (schematic designator R51)
R119 "100K 1%" RESC1005-STAR 3228.35,5198.82 r270 bottom locked (schematic designator R15)
R120 "68K 1%" RESC1005-STAR 3464.57,5198.82 r90 bottom locked (schematic designator R18)
R121 "47K 1%" RESC1005-STAR 2874.02,5198.82 r270 bottom locked (schematic designator R29)
R122 "1K 1%" RESC1005-STAR 4866.13,4784.14 r270 bottom (schematic designator R16)
R123 "1K 1%" RESC1005-STAR 4866.13,5299.2 r90 bottom (schematic designator R13)
R124 "47K 1%" RESC1005-STAR 3110.24,5037.4 r90 bottom locked (schematic designator R17)
R125 "47K 1%" RESC1005-STAR 3228.35,5037.4 r90 bottom locked (schematic designator R20)
R126 "47K 1%" RESC1005-STAR 3700.79,5198.82 r270 bottom locked (schematic designator R22)
R127 "1K 1%" RESC1005-STAR 3110.24,5198.82 r270 bottom locked (schematic designator R21)
R128 "3K3 1%" RESC1005-STAR 3799.21,5037.4 r90 bottom locked (schematic designator R23)
R129 "47K 1%" RESC1005-STAR 3582.68,5198.82 r270 bottom locked (schematic designator R24)
R130 "1K 1%" RESC1005-STAR 3346.46,5588.58 r270 bottom locked (schematic designator R26)
R131 "2K2 1%" RESC1005-STAR 3464.57,5588.58 r270 bottom locked (schematic designator R25)
R132 "2K2 1%" RESC1005-STAR 2992.13,5198.82 r90 bottom locked (schematic designator R27)
R133 "47K 1%" RESC1005-STAR 4014.17,5751.58 r90 bottom locked (schematic designator R5)
R134 "47K 1%" RESC1005-STAR 3464.57,5037.4 r270 bottom locked (schematic designator R4)
R135 "220R 1%" RESC1005-STAR 2917.32,5751.97 r180 bottom (schematic designator R2MIC)
R136 "2K2 1%" RESC1005-STAR 2917.32,5889.76 r180 bottom (schematic designator R1MIC)
R137 "10K 1%" RESC1005-STAR 5267.71,5035.42 r180 bottom (schematic designator R1)
R138 "120R 1%" RESC1005-STAR 5653.13,4398.03 r270 bottom (schematic designator R5)
R139 "120R 1%" RESC1005-STAR 5401.17,4398.03 r90 bottom (schematic designator R2)
R140 "120R 1%" RESC1005-STAR 5570.46,4398.03 r270 bottom (schematic designator R4)
R141 "120R 1%" RESC1005-STAR 5483.84,4398.03 r90 bottom (schematic designator R6)
R142 "2K2 1%" RESC1005-STAR 928.68,2958.45 r180 bottom (schematic designator R1)
R143 "2K2 1%" RESC1005-STAR 3328.68,3113.45 r180 bottom (schematic designator R1)
R144 "2K2 1%" RESC1005-STAR 4511.81,3243.48 r270 bottom (schematic designator R1)
R145 "4K7 1%" RESC1005-STAR 10486.28,1639.3 r90 bottom (schematic designator R8)
R146 "4K7 1%" RESC1005-STAR 10530.57,1639.3 r90 bottom (schematic designator R7)
R147 "4K7 1%" RESC1005-STAR 10574.86,1639.3 r90 bottom (schematic designator R6)
R148 "4K7 1%" RESC1005-STAR 10619.15,1639.3 r90 bottom (schematic designator R5)
R149 "4K7 1%" RESC1005-STAR 10663.44,1639.3 r90 bottom (schematic designator R4)
R150 "4K7 1%" RESC1005-STAR 10707.73,1639.3 r90 bottom (schematic designator R3)
R151 "4K7 1%" RESC1005-STAR 10752.03,1639.3 r90 bottom (schematic designator R2)
R152 "4K7 1%" RESC1005-STAR 10796.32,1639.3 r90 bottom (schematic designator R1)
R153 "4K7 1%" RESC1005-STAR 10353.41,1639.3 r270 bottom (schematic designator R1)
R154 "4K7 1%" RESC1005-STAR 10397.7,1639.3 r270 bottom (schematic designator R2)
R155 "4K7 1%" RESC1005-STAR 10441.99,1639.3 r90 bottom (schematic designator R3)
R156 "4K7 1%" RESC1005-STAR 10840.61,1639.3 r270 bottom (schematic designator R4)
R157 "4K7 1%" RESC1005-STAR 10884.9,1639.3 r90 bottom (schematic designator R5)
R158 "4K7 1%" RESC1005-STAR 6016.82,1915 r0 bottom locked (schematic designator R1)
R159 "4K7 1%" RESC1005-STAR 8983.28,3843.38 r0 bottom (schematic designator R1)
R160 "10K 1%" RESC1005-STAR 6580.8,4517.47 r0 bottom (schematic designator R1)
R161 "1K 1%" RESC1005-STAR 6580.8,4567.47 r0 bottom (schematic designator R2)
R162 "0R047 1%" RESC3216 2431.1,3661.42 r270 bottom (schematic designator R27_CS)
R163 "0R047 1%" RESC3216 2647.64,3868.11 r270 bottom (schematic designator R32_CS)
R164 "0R047 1%" RESC3216 925.2,3149.61 r270 bottom (schematic designator R20_CS)
R165 "0R047 1%" RESC3216 2332.68,3661.42 r270 bottom (schematic designator R28_CS)
R166 "0R047 1%" RESC3216 2844.49,3868.11 r270 bottom (schematic designator R33_CS)
R167 "0R047 1%" RESC3216 826.77,3149.61 r270 bottom (schematic designator R21_CS)
R168 "0R047 1%" RESC3216 2234.25,3661.42 r270 bottom (schematic designator R29_CS)
R169 "0R047 1%" RESC3216 2746.06,3868.11 r270 bottom (schematic designator R34_CS)
R170 "0R047 1%" RESC3216 728.35,3149.61 r270 bottom (schematic designator R22_CS)
R171 "0R047 1%" RESC3216 2037.4,3661.42 r270 bottom (schematic designator R30_CS)
R172 "0R047 1%" RESC3216 2942.91,3868.11 r270 bottom (schematic designator R35_CS)
R173 "0R047 1%" RESC3216 629.92,3149.61 r270 bottom (schematic designator R23_CS)
R174 "0R047 1%" RESC3216 2135.83,3661.42 r270 bottom (schematic designator R31_CS)
R175 "0R047 1%" RESC3216 2549.21,3868.11 r270 bottom (schematic designator R36_CS)
R176 "0R047 1%" RESC3216 531.5,3149.61 r270 bottom (schematic designator R24_CS)
R177 "0R047 1%" RESC3216 7883.86,3710.63 r270 bottom (schematic designator R25_CS)
R178 "0R047 1%" RESC3216 5602.45,1117.51 r270 bottom (schematic designator R37_CS)
R179 "0R047 1%" RESC3216 8011.81,3710.63 r270 bottom (schematic designator R26_CS)
R180 "0R047 1%" RESC3216 6673.79,1092.98 r270 bottom (schematic designator R38_CS)
R181 "10K 1%" RESC1005-STAR 4998.03,4368.11 r90 bottom (schematic designator R5_CS)
R182 "10K 1%" RESC1005-STAR 4745.8,4368.11 r90 bottom (schematic designator R7_CS)
R183 "10K 1%" RESC1005-STAR 4489.11,4493.8 r270 bottom (schematic designator R9_CS)
R184 "2K7 1%" RESC1005-STAR 4528.77,4207.31 r270 bottom (schematic designator R14_CS)
R185 "2K7 1%" RESC1005-STAR 4578.74,4207.31 r270 bottom (schematic designator R13_CS)
R186 "10K 1%" RESC1005-STAR 4955.22,4368.11 r90 bottom (schematic designator R6_CS)
R187 "2K7 1%" RESC1005-STAR 4789.8,4368.11 r90 bottom (schematic designator R8_CS)
R188 "10K 1%" RESC1005-STAR 4456.69,4562.99 r180 bottom (schematic designator R10_CS)
R189 "120R 1%" RESC1005-STAR 5314.55,4398.03 r270 bottom (schematic designator R7)
R190 "4K7 1%" RESC1005-STAR 2086.61,3474.41 r90 bottom locked (schematic designator R1)
R191 "4K7 1%" RESC1005-STAR 2165.35,3474.41 r90 bottom locked (schematic designator R2)
R192 "4K7 1%" RESC1005-STAR 1929.13,3474.41 r90 bottom locked (schematic designator R3)
R193 "4K7 1%" RESC1005-STAR 2007.87,3474.41 r90 bottom locked (schematic designator R4)
R194 "100R 1%" RESC1005-STAR 2086.61,3301.18 r270 bottom locked (schematic designator R5)
R195 "100R 1%" RESC1005-STAR 2165.35,3301.18 r270 bottom locked (schematic designator R6)
R196 "100R 1%" RESC1005-STAR 1929.13,3301.18 r270 bottom locked (schematic designator R7)
R197 "100R 1%" RESC1005-STAR 2007.87,3301.18 r270 bottom locked (schematic designator R8)
R198 "4K7 1%" RESC1005-STAR 1850.39,3476.38 r90 bottom locked (schematic designator R9)
R199 "4K7 1%" RESC1005-STAR 1771.65,3476.38 r90 bottom locked (schematic designator R10)
R200 "4K7 1%" RESC1005-STAR 1614.17,3476.38 r90 bottom locked (schematic designator R11)
R201 "4K7 1%" RESC1005-STAR 1692.91,3476.38 r90 bottom locked (schematic designator R12)
R202 "100R 1%" RESC1005-STAR 1850.39,3299.21 r270 bottom locked (schematic designator R13)
R203 "100R 1%" RESC1005-STAR 1771.65,3299.21 r270 bottom locked (schematic designator R14)
R204 "100R 1%" RESC1005-STAR 1614.17,3301.18 r270 bottom locked (schematic designator R15)
R205 "100R 1%" RESC1005-STAR 1692.91,3301.18 r270 bottom locked (schematic designator R16)
R206 "4K7 1%" RESC1005-STAR 1535.43,3476.38 r90 bottom locked (schematic designator R17)
R207 "100R 1%" RESC1005-STAR 1535.43,3301.18 r270 bottom locked (schematic designator R18)
R208 "4K7 1%" RESC1005-STAR 4950.79,3165.35 r0 bottom locked (schematic designator R1)
R209 "4K7 1%" RESC1005-STAR 4950.79,3086.61 r0 bottom locked (schematic designator R2)
R210 "4K7 1%" RESC1005-STAR 4950.79,3322.84 r0 bottom locked (schematic designator R3)
R211 "4K7 1%" RESC1005-STAR 4950.79,3244.1 r0 bottom locked (schematic designator R4)
R212 "100R 1%" RESC1005-STAR 4763.78,3165.35 r180 bottom locked (schematic designator R5)
R213 "100R 1%" RESC1005-STAR 4763.78,3086.61 r180 bottom locked (schematic designator R6)
R214 "100R 1%" RESC1005-STAR 4763.78,3322.84 r180 bottom locked (schematic designator R7)
R215 "100R 1%" RESC1005-STAR 4763.78,3244.1 r180 bottom locked (schematic designator R8)
R216 "4K7 1%" RESC1005-STAR 4950.79,3401.58 r0 bottom locked (schematic designator R9)
R217 "4K7 1%" RESC1005-STAR 4950.79,3480.32 r0 bottom locked (schematic designator R10)
R218 "4K7 1%" RESC1005-STAR 4950.79,3637.8 r0 bottom locked (schematic designator R11)
R219 "4K7 1%" RESC1005-STAR 4950.79,3559.06 r0 bottom locked (schematic designator R12)
R220 "100R 1%" RESC1005-STAR 4761.81,3401.58 r180 bottom locked (schematic designator R13)
R221 "100R 1%" RESC1005-STAR 4761.81,3480.32 r180 bottom locked (schematic designator R14)
R222 "100R 1%" RESC1005-STAR 4761.81,3637.8 r180 bottom locked (schematic designator R15)
R223 "100R 1%" RESC1005-STAR 4761.81,3559.06 r180 bottom locked (schematic designator R16)
R224 "4K7 1%" RESC1005-STAR 4950.79,3716.54 r0 bottom locked (schematic designator R17)
R225 "100R 1%" RESC1005-STAR 4761.81,3716.54 r180 bottom locked (schematic designator R18)
R226 "4K7 1%" RESC1005-STAR 2572.05,3571.11 r180 bottom (schematic designator R1)
R227 "4K7 1%" RESC1005-STAR 2572.05,3488.19 r180 bottom locked (schematic designator R2)
R228 "4K7 1%" RESC1005-STAR 2397.24,3173.23 r180 bottom locked (schematic designator R3)
R229 "4K7 1%" RESC1005-STAR 2397.24,3251.97 r180 bottom locked (schematic designator R4)
R230 "100R 1%" RESC1005-STAR 2572.05,3330.71 r0 bottom locked (schematic designator R5)
R231 "100R 1%" RESC1005-STAR 2572.05,3409.45 r0 bottom locked (schematic designator R6)
R232 "100R 1%" RESC1005-STAR 2572.05,3173.23 r0 bottom locked (schematic designator R7)
R233 "100R 1%" RESC1005-STAR 2572.05,3251.97 r0 bottom locked (schematic designator R8)
R234 "4K7 1%" RESC1005-STAR 2397.24,3094.49 r180 bottom locked (schematic designator R9)
R235 "4K7 1%" RESC1005-STAR 2397.24,3015.75 r180 bottom locked (schematic designator R10)
R236 "4K7 1%" RESC1005-STAR 2397.24,2858.27 r180 bottom locked (schematic designator R11)
R237 "4K7 1%" RESC1005-STAR 2397.24,2937.01 r180 bottom locked (schematic designator R12)
R238 "100R 1%" RESC1005-STAR 2572.05,3094.49 r0 bottom locked (schematic designator R13)
R239 "100R 1%" RESC1005-STAR 2572.05,3015.75 r0 bottom locked (schematic designator R14)
R240 "100R 1%" RESC1005-STAR 2570.08,2858.27 r0 bottom locked (schematic designator R15)
R241 "100R 1%" RESC1005-STAR 2570.08,2937.01 r0 bottom locked (schematic designator R16)
R242 "4K7 1%" RESC1005-STAR 2397.24,2779.53 r180 bottom locked (schematic designator R17)
R243 "100R 1%" RESC1005-STAR 2570.08,2779.53 r0 bottom locked (schematic designator R18)
R244 "4K7 1%" RESC1005-STAR 3007.87,785.43 r90 bottom locked (schematic designator R1)
R245 "4K7 1%" RESC1005-STAR 2929.13,785.43 r90 bottom locked (schematic designator R2)
R246 "4K7 1%" RESC1005-STAR 3165.35,785.43 r90 bottom locked (schematic designator R3)
R247 "4K7 1%" RESC1005-STAR 3086.61,785.43 r90 bottom locked (schematic designator R4)
R248 "100R 1%" RESC1005-STAR 3007.87,645.67 r270 bottom (schematic designator R5)
R249 "100R 1%" RESC1005-STAR 2929.13,645.67 r270 bottom (schematic designator R6)
R250 "100R 1%" RESC1005-STAR 3165.35,645.67 r270 bottom (schematic designator R7)
R251 "100R 1%" RESC1005-STAR 3086.61,645.67 r270 bottom (schematic designator R8)
R252 "4K7 1%" RESC1005-STAR 3244.09,785.43 r90 bottom locked (schematic designator R9)
R253 "4K7 1%" RESC1005-STAR 3322.83,785.43 r90 bottom locked (schematic designator R10)
R254 "4K7 1%" RESC1005-STAR 3480.32,785.43 r90 bottom locked (schematic designator R11)
R255 "4K7 1%" RESC1005-STAR 3401.57,785.43 r90 bottom locked (schematic designator R12)
R256 "100R 1%" RESC1005-STAR 3244.09,645.67 r270 bottom (schematic designator R13)
R257 "100R 1%" RESC1005-STAR 3322.83,645.67 r270 bottom (schematic designator R14)
R258 "100R 1%" RESC1005-STAR 3480.32,645.67 r270 bottom (schematic designator R15)
R259 "100R 1%" RESC1005-STAR 3401.57,645.67 r270 bottom (schematic designator R16)
R260 "4K7 1%" RESC1005-STAR 3559.06,785.43 r90 bottom locked (schematic designator R17)
R261 "100R 1%" RESC1005-STAR 3559.06,645.67 r270 bottom (schematic designator R18)
R262 "4K7 1%" RESC1005-STAR 3913.39,785.43 r90 bottom locked (schematic designator R1)
R263 "4K7 1%" RESC1005-STAR 3834.65,785.43 r90 bottom locked (schematic designator R2)
R264 "4K7 1%" RESC1005-STAR 4070.87,785.43 r90 bottom locked (schematic designator R3)
R265 "4K7 1%" RESC1005-STAR 3992.13,785.43 r90 bottom locked (schematic designator R4)
R266 "100R 1%" RESC1005-STAR 3913.39,643.7 r270 bottom (schematic designator R5)
R267 "100R 1%" RESC1005-STAR 3834.65,643.7 r270 bottom (schematic designator R6)
R268 "100R 1%" RESC1005-STAR 4070.87,643.7 r270 bottom (schematic designator R7)
R269 "100R 1%" RESC1005-STAR 3992.13,643.7 r270 bottom (schematic designator R8)
R270 "4K7 1%" RESC1005-STAR 4149.61,785.43 r90 bottom locked (schematic designator R9)
R271 "4K7 1%" RESC1005-STAR 4228.35,785.43 r90 bottom locked (schematic designator R10)
R272 "4K7 1%" RESC1005-STAR 4385.83,785.43 r90 bottom locked (schematic designator R11)
R273 "4K7 1%" RESC1005-STAR 4307.09,785.43 r90 bottom locked (schematic designator R12)
R274 "100R 1%" RESC1005-STAR 4149.61,643.7 r270 bottom (schematic designator R13)
R275 "100R 1%" RESC1005-STAR 4228.35,643.7 r270 bottom (schematic designator R14)
R276 "100R 1%" RESC1005-STAR 4385.83,643.7 r270 bottom (schematic designator R15)
R277 "100R 1%" RESC1005-STAR 4307.09,643.7 r270 bottom (schematic designator R16)
R278 "4K7 1%" RESC1005-STAR 4464.57,785.43 r90 bottom locked (schematic designator R17)
R279 "100R 1%" RESC1005-STAR 4464.57,643.7 r270 bottom (schematic designator R18)
R280 "4K7 1%" RESC1005-STAR 844.49,4417.32 r0 bottom locked (schematic designator R3_HJ)
R281 "4K7 1%" RESC1005-STAR 844.49,4515.75 r0 bottom locked (schematic designator R2_HJ)
R282 "4K7 1%" RESC1005-STAR 844.49,4318.9 r0 bottom locked (schematic designator R1_HJ)
R283 "4K7 1%" RESC1005-STAR 844.49,4220.47 r0 bottom locked (schematic designator R4_HJ)
R284 "100R 1%" RESC1005-STAR 667.32,4417.32 r180 bottom locked (schematic designator R7_HJ)
R285 "100R 1%" RESC1005-STAR 667.32,4515.75 r180 bottom locked (schematic designator R6_HJ)
R286 "100R 1%" RESC1005-STAR 667.32,4318.9 r180 bottom locked (schematic designator R5_HJ)
R287 "100R 1%" RESC1005-STAR 667.32,4220.47 r180 bottom locked (schematic designator R8_HJ)
R288 "4K7 1%" RESC1005-STAR 844.49,4122.05 r0 bottom locked (schematic designator R9_HJ)
R289 "4K7 1%" RESC1005-STAR 844.49,4023.62 r0 bottom locked (schematic designator R12_HJ)
R290 "4K7 1%" RESC1005-STAR 844.49,3826.77 r0 bottom locked (schematic designator R11_HJ)
R291 "4K7 1%" RESC1005-STAR 844.49,3925.2 r0 bottom locked (schematic designator R10_HJ)
R292 "100R 1%" RESC1005-STAR 667.32,4122.05 r180 bottom locked (schematic designator R13_HJ)
R293 "100R 1%" RESC1005-STAR 667.32,4023.62 r180 bottom locked (schematic designator R16_HJ)
R294 "100R 1%" RESC1005-STAR 667.32,3826.77 r180 bottom locked (schematic designator R15_HJ)
R295 "100R 1%" RESC1005-STAR 667.32,3925.2 r180 bottom locked (schematic designator R14_HJ)
R296 "1K 1%" RESC1005-STAR 661.42,5337.01 r180 bottom locked (schematic designator R6)
R297 "4K7 1%" RESC1005-STAR 661.42,5277.95 r0 bottom locked (schematic designator R2)
R298 "4K7 1%" RESC1005-STAR 661.42,5218.9 r0 bottom locked (schematic designator R1)
R299 "4K7 1%" RESC1005-STAR 661.42,5100.79 r0 bottom locked (schematic designator R4)
R300 "4K7 1%" RESC1005-STAR 661.42,5041.73 r0 bottom locked (schematic designator R3)
R301 "100R 1%" RESC1005-STAR 661.42,5159.84 r0 bottom locked (schematic designator R5)
R302 "1K 1%" RESC1005-STAR 661.42,5396.06 r0 bottom locked (schematic designator R7)